# Altium PCB PowerBoardPCB.PcbDoc
Units mil, origin at the board's own origin, x right, y up, seen from the top; angles counter-clockwise.
Board outline 6000 x 4000 mil, 2 copper layers (Top Layer, Bottom Layer); 8 components, 7 nets, 20 pads, 2 vias.
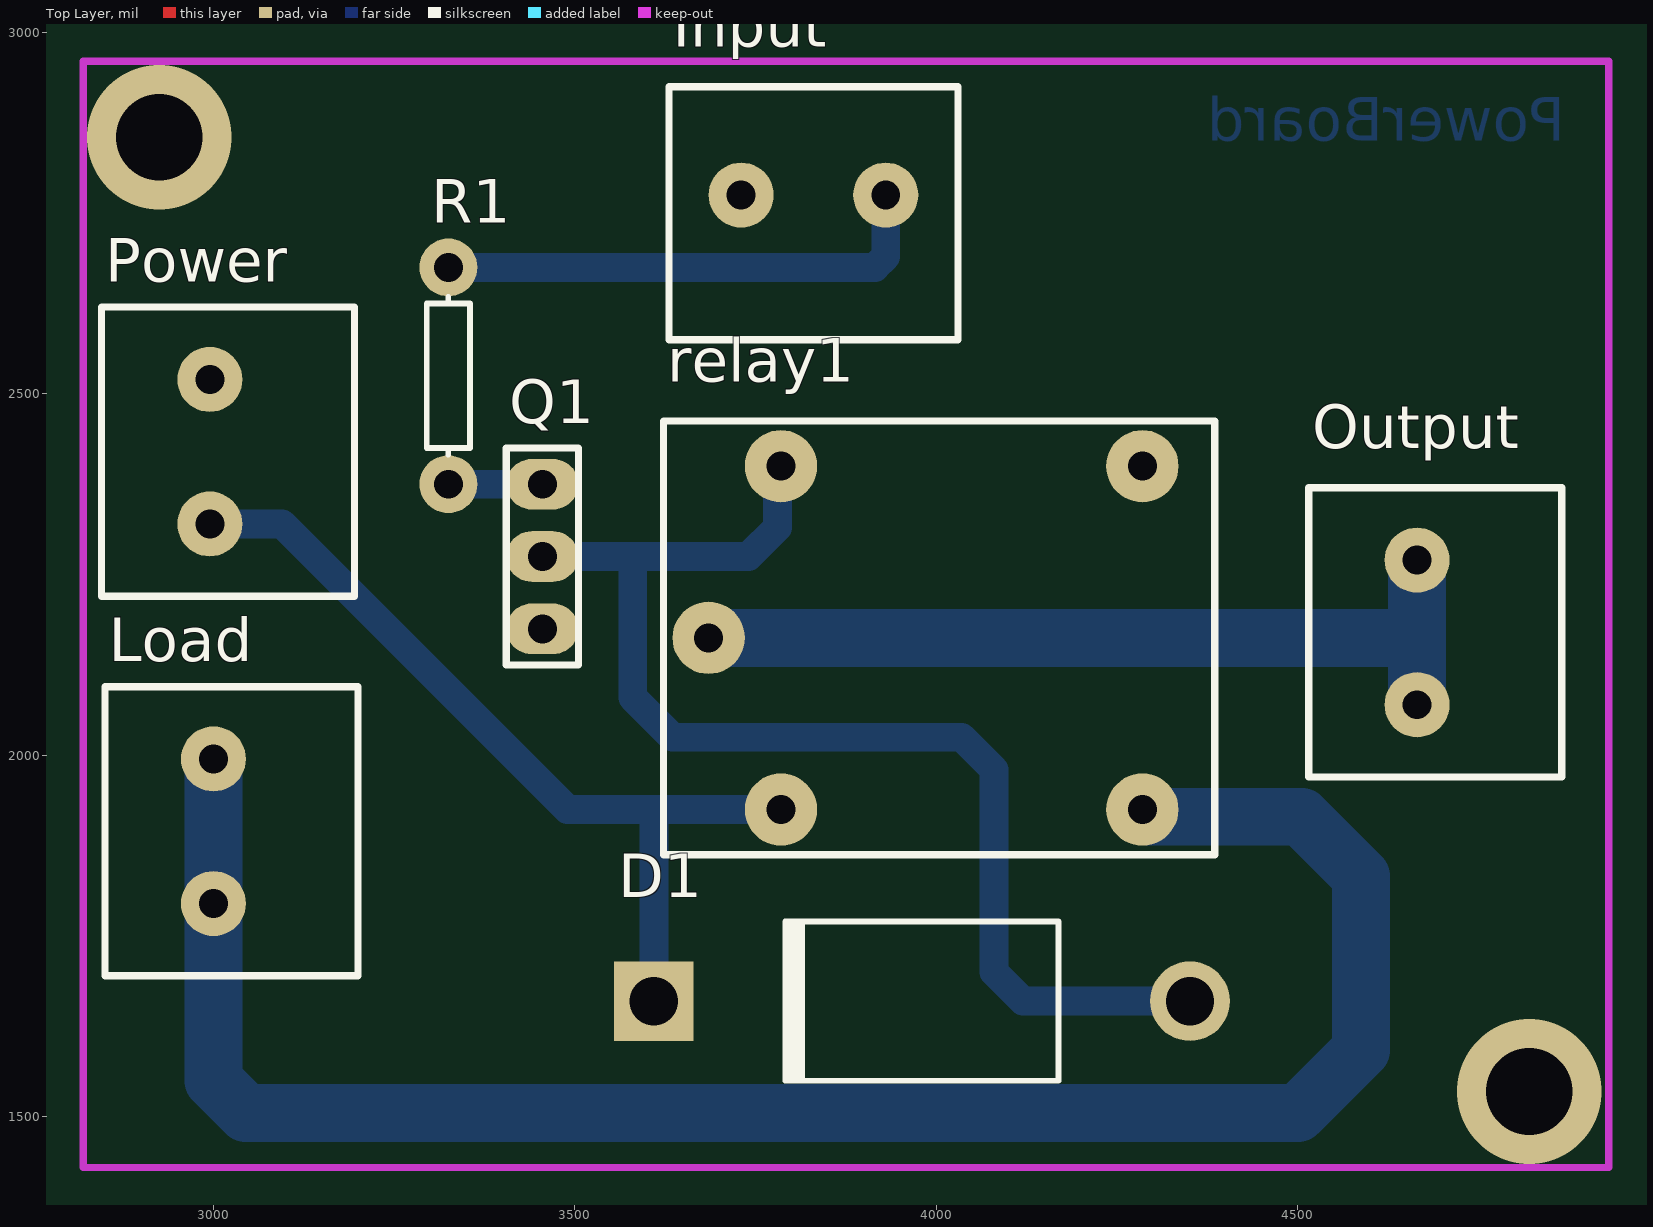
[diagram p0: Top Layer view]
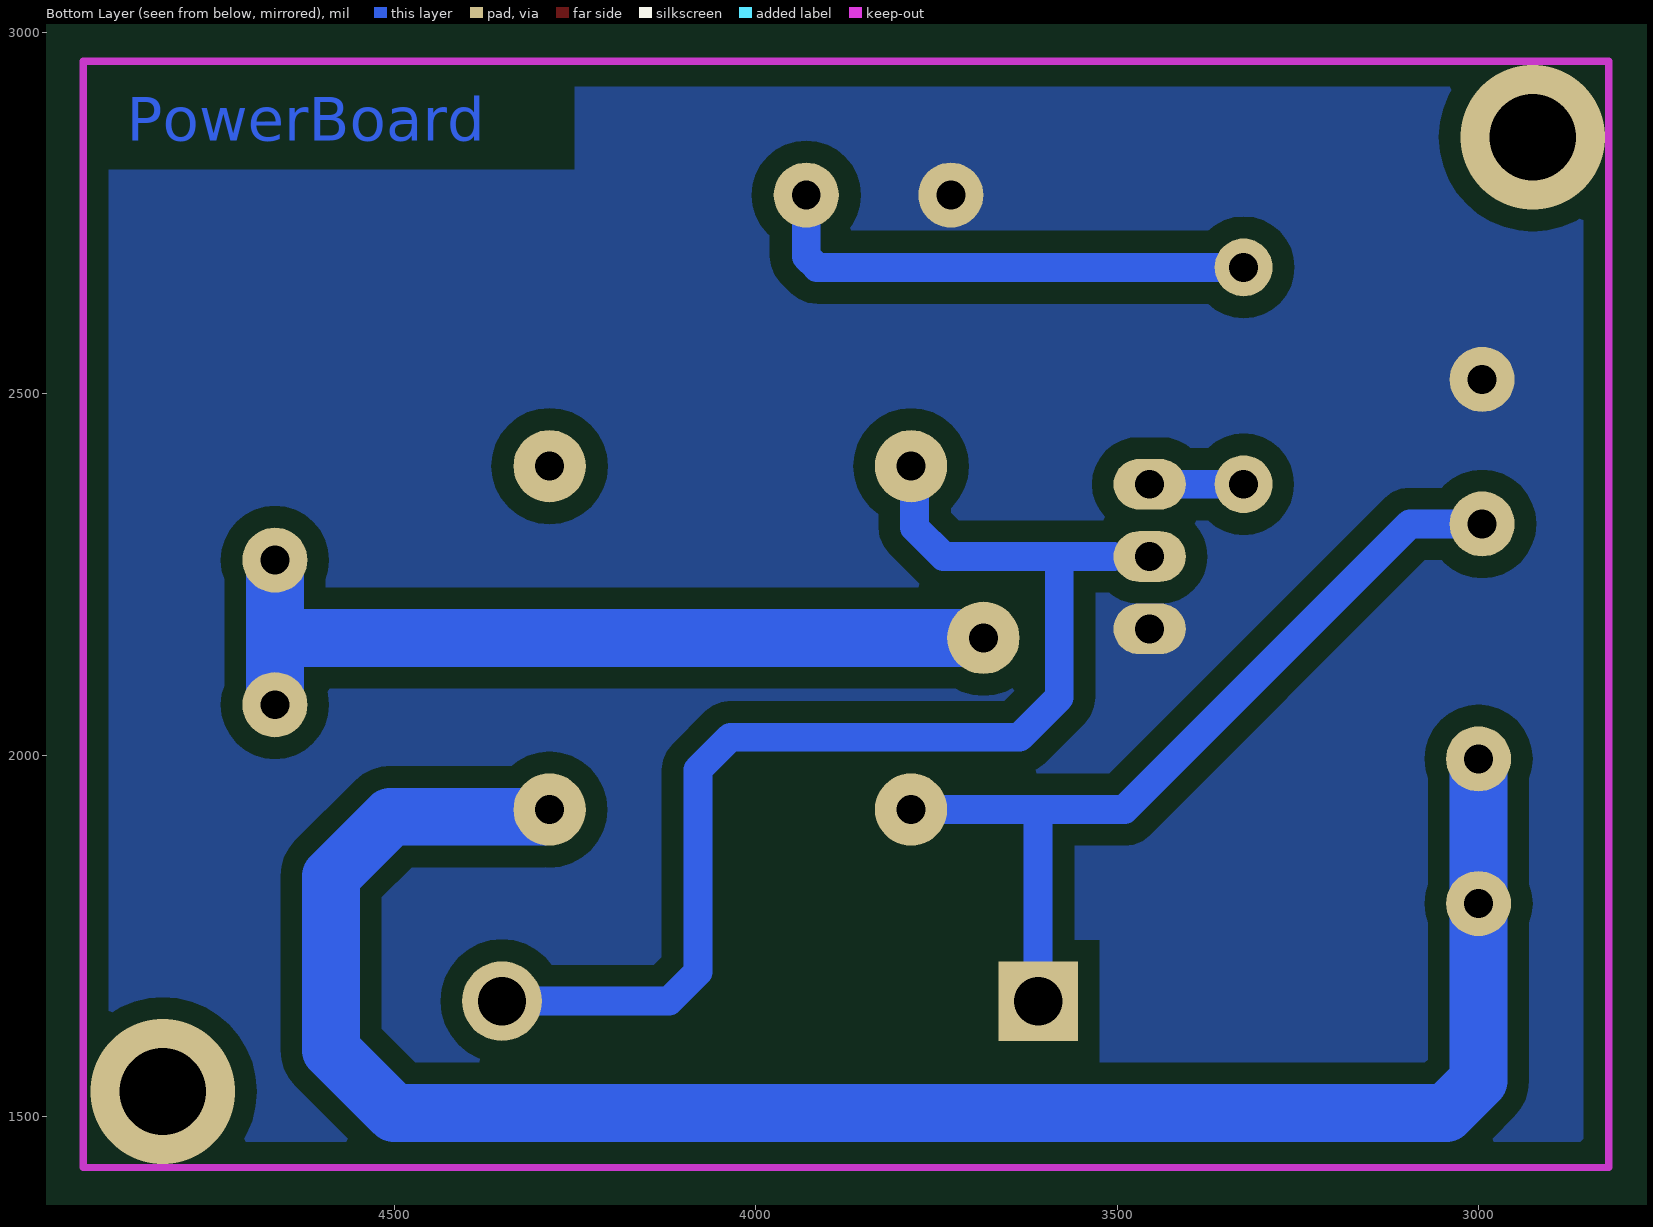
[diagram p1: Bottom Layer view, seen from below]

## Layer stack, top to bottom
Top Layer: signal copper 1.4
Dielectric: dielectric 12.6, FR-4, Dk 4.8
Bottom Layer: signal copper 1.4

## Board outline
1000,1000 7000,1000 7000,5000 1000,5000

## Design rules (kind name [scope] priority, off if disabled: settings)
Clearance [All] p1: gap=30
PolygonConnect [All] p1: connectstyle=Direct reliefconductorwidth=10 reliefentries=4 polygonreliefangle="90 Angle" airgapwidth=10
RoutingVias [All] p1: holewidth=28 width=50 viastyle="Through Hole" minholewidth=28 minwidth=50 maxholewidth=28 maxwidth=50
SolderMaskExpansion [All] p1: expansion=4
Width [All] p1: maxlimit=100 minlimit=10 preferedwidth=60 toplayer_maxwidth=10 toplayer_prefwidth=10 bottomlayer_minwidth=40 minimp=50.000000 maximp=50.000000 favimp=50.000000
28 further rules are at their usual default settings.

## Components (designator, comment, footprint, x,y, rotation, side; value= is the part's Value field where it differs from the comment)
D1 "Diode 1N5408" DO-201AD 3980,1660 r180 top
Input "Klema" Klema 3830,2775 r180 top
Load "Klema" Klema 3000,1895 r270 top
Output "Klema" Klema 4665,2170 r270 top
Power "Klema" Klema 2995,2420 r270 top
Q1 "BD139" BD139 3455,2275 r90 top
R1 "Res1" AXIAL-0.3 3325,2525 r270 top
relay1 "RAS1215" RAS1215 4035,2150 r180 top

## Footprints (in the part's own frame and the unit in brackets; to place one, negate y for a bottom-side part, rotate by r counter-clockwise, add the part's x,y. Pads: shape width x height; smd on the part's side, far side on the other; paste and mask are expansions set on the pad)
AXIAL-0.3 [mil] "Axial Device, Thru-Hole; 2 Leads; 0.3 in Pin Spacing"
  round 80 hole 40: 1(-150,0) 2(150,0)
  silkscreen extent -109,-30 109,30
BD139 [mil]
  oval 70x100 hole 40: 1(-100,0) 2(0,0) 3(100,0)
  silkscreen extent -150,-50 150,50
DO-201AD [mm] "Diode, Axial; Body 9.5 x 5.6 mm (LxDia. max), Lead Dia. 1.32 mm (max)"
  round 2.8 hole 1.7: 1(-9.42,0)
  rect 2.8x2.8 hole 1.7: 2(9.42,0)
  silkscreen extent -4.8,-2.8 4.9,2.8
Klema [mil]
  round 90 hole 40: 1(-100,0) 2(100,0)
  silkscreen extent -200,-150 200,200
RAS1215 [mil]
  round 100 hole 40: 1(-250,225) 2(-250,-250) 3(250,225) 4(350,-12.5) 5(250,-250)
  silkscreen extent -350,-313 413,288

## Part data
D1: "3 Amp Medium Power Silicon Rectifier Diode"
R1: "Resistor"

## Via types
v1: diameter 200, hole 120, Top Layer to Bottom Layer, 2 vias

## Nets (pads, with @x,y where several pads share a name; then routed paths per layer and width w, separated by ;. In a path a pad name is that pad's centre, name@x,y a point inside that pad or via, vN(x,y) a via of type N, cw(c..) or ccw(c..) an arc to the next point about the centre after c; other vN are vias at no path point)
12V: D1.2 Power.2 relay1.3 | length 1222.4
  Bottom Layer w40: Power.2 3095,2320 3490,1925 3600,1925 ; D1.2 3609.13,1915.87 3600,1925 ; relay1.3 3600,1925
GND: Input.2 Power.1 Q1.1
INPUT: Input.1 R1.1 | length 696.2
  Bottom Layer w40: R1.1 3915,2675 3930,2690 Input.1
NetOutput_1: Output.1 Output.2 relay1.4 | length 1183.1
  Bottom Layer w80: relay1.4 4657.5,2162.5 4665,2170 ; Output.2 4665,2170 ; Output.1 4665,2170
NetQ1_3: Q1.3 R1.2 | length 130
  Bottom Layer w40: R1.2 Q1.3
OUPTUT: D1.1 Q1.2 relay1.5 | length 1682.5
  Bottom Layer w40: 3505,2275 3580,2275 ; relay1.5 3780,2395 3780,2315 3740,2275 3580,2275 ; D1.1 4120,1660 4080,1700 4080,1980 4035,2025 3635,2025 3580,2080 3580,2275
PHASE: Load.1 Load.2 relay1.1 | length 2668.2
  Bottom Layer w80: Load.1 Load.2 3000,1550 3045,1505 4500,1505 4587.5,1592.5 4587.5,1832.5 4505,1915 4295,1915 relay1.1
pads on no net: relay1.2
copper on no net:
  other v1: 4820,1535 2925,2855

## Polygon pours and split planes (outlines as drawn)
GND on Bottom Layer "Top Layer-No Net" (solid, remove dead copper, pour order 3): 1000,1000 7000,1000 7000,5000 1000,5000

## Keep-outs
Keep-Out Layer:
  lines w10: 2820,1430 2820,1450 2820,2960 4930,2960 4930,1430 2820,1430

## Other copper
Bottom Layer:
  text "PowerBoard" at 4870,2850 h60